# Altium PCB NB3000XN.PcbDoc (part 67 of 71)
Units mil, origin at the board's own origin, x right, y up, seen from the top; angles counter-clockwise.
Board outline 9527.56 x 6929.77 mil, 6 copper layers (Top Layer, GND+SHIELD, MidLayer1, MidLayer2, P2 - 3V3+5V0, Bottom Layer), stack 62.375 mil thick; 832 components, 1027 nets, 4655 pads, 4981 vias.
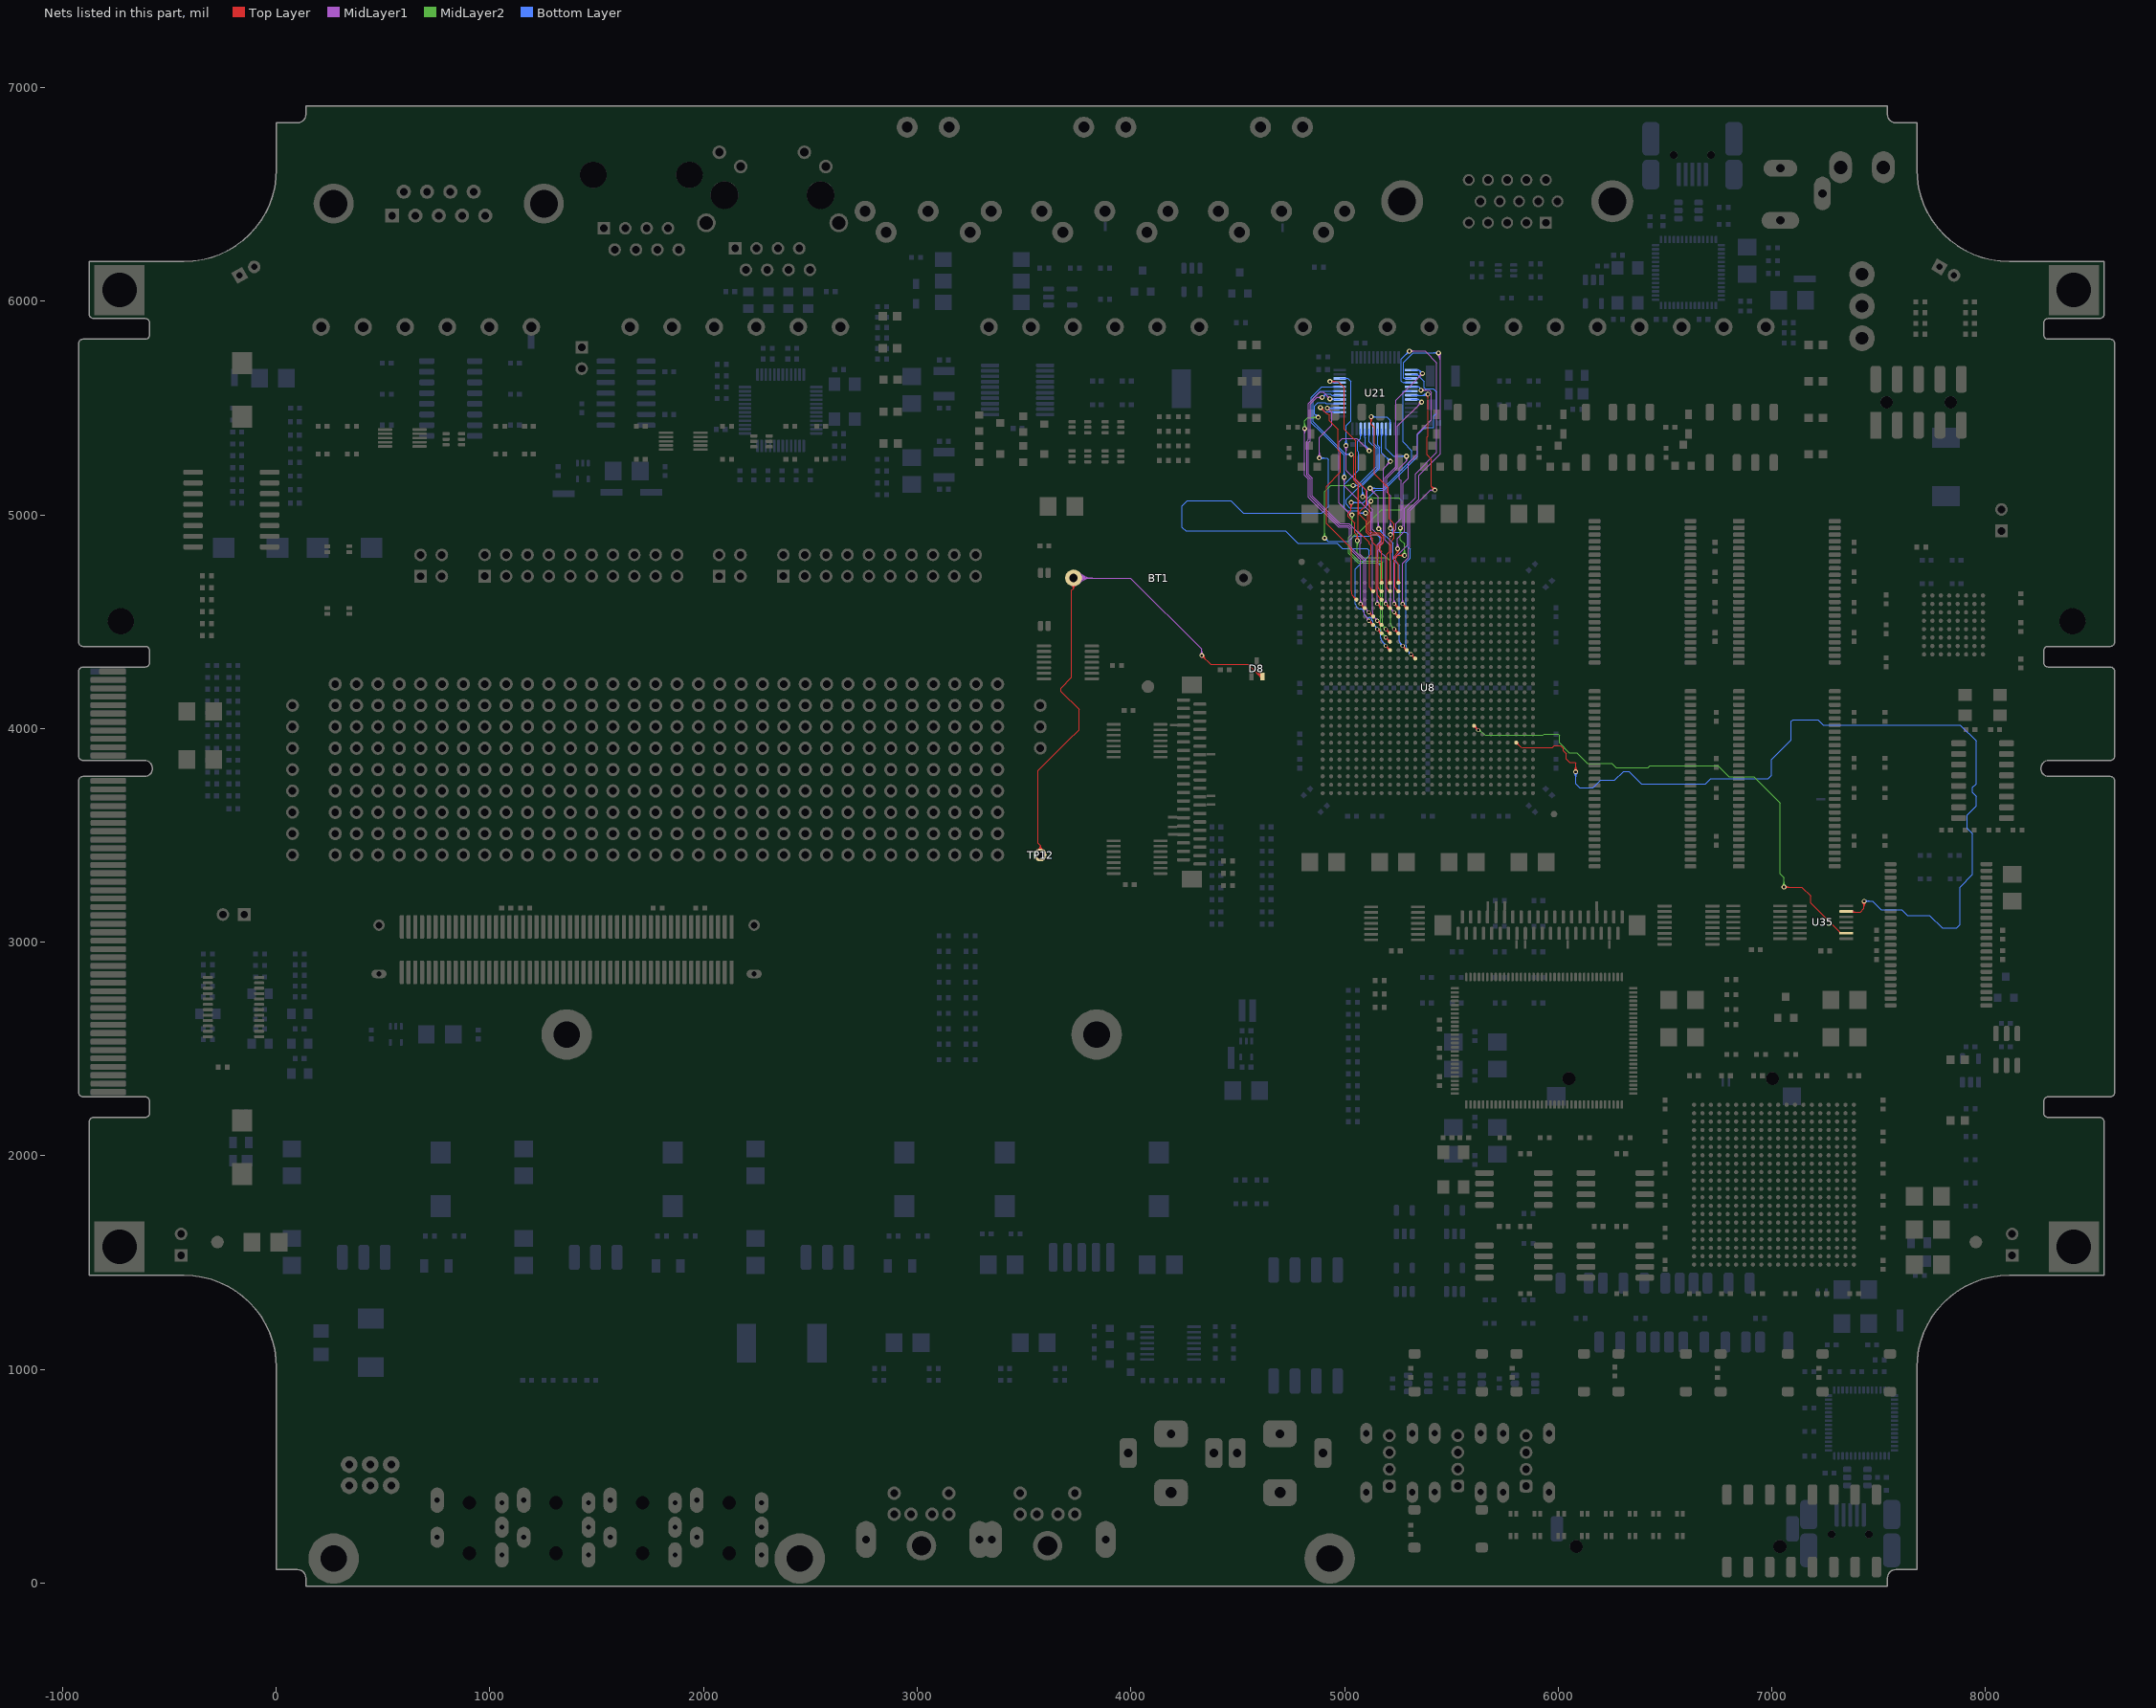
[diagram p71: the nets of this part, all layers, seen from the top]

## Via types
v1: diameter 23, hole 11.81, Top Layer to Bottom Layer, 3672 vias
v2: diameter 26, hole 11.81, Top Layer to Bottom Layer, 461 vias
v3: diameter 19, hole 11.81, Top Layer to Bottom Layer, tented both sides, 396 vias
v4: diameter 23.62, hole 11.81, Top Layer to Bottom Layer, 288 vias
v5: diameter 20, hole 11.81, Top Layer to Bottom Layer, 91 vias
v6: diameter 23, hole 11.81, Top Layer to Bottom Layer, tented both sides, 50 vias
v7: diameter 31, hole 11.81, Top Layer to Bottom Layer, 15 vias
v8: diameter 27.56, hole 11.81, Top Layer to Bottom Layer, tented both sides, 4 vias
v9: diameter 29, hole 11.81, Top Layer to Bottom Layer, 3 vias
v10: diameter 21, hole 11.81, Top Layer to Bottom Layer, 1 vias

## Nets (pads, with @x,y where several pads share a name; then routed paths per layer and width w, separated by ;. In a path a pad name is that pad's centre, name@x,y a point inside that pad or via, vN(x,y) a via of type N, cw(c..) or ccw(c..) an arc to the next point about the centre after c; other vN are vias at no path point) (continued)
USER_LEDS.LED7.GREEN: U8.Y24 U35.13 | length 4556.9
  Top Layer w4: v1@6075.14,3804.09 ccw(c6058.92,3820.31) 6081.86,3820.31 ccw(c6104.79,3820.31) v1@6088.57,3804.09 ; v1@6077.97,3801.26 ccw(c6068.58,3810.65) 6081.86,3810.65 ccw(c6095.14,3810.65) v1@6085.75,3801.26 ; v1(6081.86,3797.37) 6081.86,3838.14 6078.79,3841.21 6054.63,3841.21 6037.5,3858.34 6037.5,3882.73 6024.02,3896.2 6024.02,3907.29 6012.16,3919.15 5981.46,3919.15 5972.54,3910.23 5920,3910.23 5910,3910.23 5843.27,3910.23 ; U35.13@7348.5,3141.71 7415.19,3141.71 7431.86,3158.37 v1(7431.86,3191.71) ; U35.13@7374.98,3144.41 ccw(c7381.51,3150.93) 7381.51,3141.71 ; U35.13@7377.81,3147.24 ccw(c7391.16,3160.59) 7391.16,3141.71 ; v1@7425.14,3184.99 cw(c7408.92,3168.77) 7431.86,3168.77 cw(c7454.79,3168.77) v1@7438.57,3184.99 ; v1@7427.97,3187.82 cw(c7418.58,3178.43) 7431.86,3178.43 cw(c7445.14,3178.43) v1@7435.75,3187.82 ; 5815.92,3921.56 ccw(c5843.27,3948.91) 5843.27,3910.23 ; 5815.92,3921.56 ccw(c5843.27,3948.91) 5843.27,3910.23 ; 5815.92,3921.56 ccw(c5803.39,3909.03) 5803.39,3926.75 cw(c5803.39,3909.03) 5815.92,3921.56 ; 5815.92,3921.56 cw(c5828.45,3934.09) 5810.73,3934.09 ccw(c5828.45,3934.09) 5815.92,3921.56
  Bottom Layer w4: v1@6075.14,3790.66 cw(c6058.92,3774.44) 6081.86,3774.44 cw(c6104.79,3774.44) v1@6088.57,3790.66 ; v1@6077.97,3793.49 cw(c6068.58,3784.1) 6081.86,3784.1 cw(c6095.14,3784.1) v1@6085.75,3793.49 ; v1(6081.86,3797.37) 6081.86,3741.96 6099.78,3724.04 6164.19,3724.04 6198.52,3758.37 6265.19,3758.37 6306.86,3800.04 6331.86,3800.04 6390.19,3741.71 6690.19,3741.71 6715.19,3766.71 6983.19,3766.71 6998.52,3782.04 6998.52,3855.39 7090.19,3947.06 7090.19,4033.37 7098.52,4041.71 7215,4041.71 7240,4016.71 7306.86,4016.71 7345,4016.71 7881.86,4016.71 7956.86,3941.71 7956.86,3741.71 7940.19,3725.04 7940.19,3700.04 7956.86,3683.37 7956.86,3638.04 7915.19,3596.37 7915.19,3533.37 7940.19,3508.37 7940.19,3316.71 7881.86,3258.37 7881.86,3083.37 7865.19,3066.71 7797.02,3066.71 7738.73,3125 7633.69,3125 7607.23,3151.46 7510.79,3151.46 ; v1(7431.86,3191.71) 7470.54,3191.71 7510.79,3151.46 ; v1@7435.75,3187.82 cw(c7445.14,3178.43) 7445.14,3191.71 cw(c7445.14,3204.99) v1@7435.75,3195.6 ; v1@7438.57,3184.99 cw(c7454.79,3168.77) 7454.79,3191.71 cw(c7454.79,3214.64) v1@7438.57,3198.43 ; 7479.3,3182.95 7510.79,3151.46
USER_LEDS.LED7.RED: U8.V19 U35.9 | length 2687.9
  Top Layer w4: U8.V19@5606.54,4005.33 cw(c5606.54,3987.23) 5619.34,4000.03 cw(c5632.14,4012.83) U8.V19@5614.04,4012.83 ; U8.V19@5606.54,4005.49 cw(c5606.54,3987.77) 5619.07,4000.3 cw(c5631.6,4012.83) U8.V19@5613.88,4012.83 ; U8.V19@5606.54,4012.83 v3(5626.22,3993.15) ; v1(7056.86,3258.37) 7140.19,3258.37 7181.52,3217.04 7181.52,3183.71 7323.52,3041.71 7348.5,3041.71 U35.9@7348.5,3042.05 ; v1@7060.75,3254.49 cw(c7070.14,3245.1) 7070.14,3258.37 cw(c7070.14,3271.65) v1@7060.75,3262.26 ; v1@7063.57,3251.66 cw(c7079.79,3235.44) 7079.79,3258.37 cw(c7079.79,3281.31) v1@7063.57,3265.09 ; 7314.37,3050.86 cw(c7305.56,3042.05) U35.9@7318.02,3042.05 ; 7317.18,3048.06 ccw(c7322.02,3052.9) U35.9@7322.02,3046.05 ; 5613.42,4005.95 cw(c5600.61,3993.15) 5618.72,3993.15 ccw(c5600.61,3993.15) 5613.42,4005.95 ; 5613.42,4005.95 ccw(c5626.22,4018.76) 5626.22,4000.65 cw(c5626.22,4018.76) 5613.42,4005.95
  MidLayer2 w4: v3@5627.52,3985.76 cw(c5630.67,3967.93) 5641.05,3982.76 ; v3@5633.61,3994.45 ccw(c5651.44,3997.6) 5641.05,3982.76 ; v1@7050.14,3265.09 ccw(c7033.92,3281.31) 7056.86,3281.31 ccw(c7079.79,3281.31) v1@7063.57,3265.09 ; v1@7052.97,3262.26 ccw(c7043.58,3271.65) 7056.86,3271.65 ccw(c7070.14,3271.65) v1@7060.75,3262.26 ; 7055,3305 7039.86,3320.14 ; v1(7056.86,3258.37) 7056.86,3303.14 7039.86,3320.14 ; 5641.05,3982.76 5649.63,3975.68 ccw(c5665.85,3993.06) 5665.85,3969.29 5689.1,3969.29 5763.22,3969.29 5782.64,3969.29 5910,3969.29 5920,3969.29 5929.29,3969.29 5935,3975 6000,3975 6006,3969 6006,3933 6052,3887 6087.69,3887 6137.13,3837.56 6249.68,3837.56 6270.52,3816.71 6420.54,3816.71 6428.88,3825.04 6748.52,3825.04 6798.52,3775.04 6915.19,3775.04 7039.86,3650.37 7039.86,3320.14
VBATT: BT1.1 D8.2 TP12.1 | length 3668
  Top Layer w4: TP12.1@3564.05,3433.5 ccw(c3554.92,3452.64) 3576.12,3452.64 ; TP12.1@3565.78,3429.89 ccw(c3557.95,3446.29) 3576.12,3446.29 ccw(c3594.3,3446.29) TP12.1@3586.46,3429.89 ; TP12.1@3567.5,3426.28 ccw(c3560.97,3439.95) 3576.12,3439.95 ccw(c3591.27,3439.95) TP12.1@3584.74,3426.28 ; TP12.1@3576.12,3408.23 3576.12,3452.64 ; TP12.1@3588.19,3433.5 cw(c3597.33,3452.64) 3576.12,3452.64 ; BT1.1@3721.44,4669.07 cw(c3717.53,4655.42) 3731.73,4655.42 ; BT1.1@3722.54,4672.92 cw(c3719.05,4660.73) 3731.73,4660.73 cw(c3744.41,4660.73) BT1.1@3740.92,4672.92 ; BT1.1@3731.73,4705 3731.73,4655.42 ; BT1.1@3742.02,4669.07 ccw(c3745.93,4655.42) 3731.73,4655.42 ; v1@4331.86,4332.21 cw(c4331.86,4309.27) 4348.07,4325.49 cw(c4364.29,4341.71) v1@4341.36,4341.71 ; v1@4331.86,4336.21 cw(c4331.86,4322.93) 4341.25,4332.32 cw(c4350.64,4341.71) v1@4337.36,4341.71 ; v1(4331.86,4341.71) 4373.52,4300.04 4548.52,4300.04 4604,4244.57 D8.2@4615.59,4244.57 ; 4568.97,4279.59 ccw(c4615.59,4326.21) D8.2@4615.59,4260.28 ; 4575.8,4272.77 ccw(c4615.59,4312.56) D8.2@4615.59,4256.28 ; 4582.63,4265.94 ccw(c4615.59,4298.9) D8.2@4615.59,4252.28 ; 4589.46,4259.11 ccw(c4615.59,4285.24) D8.2@4615.59,4248.28 ; 4596.28,4252.28 ccw(c4615.59,4271.59) D8.2@4615.59,4244.28 ; 4603.11,4245.45 ccw(c4615.59,4257.93) D8.2@4615.59,4240.28 ; D8.2@4608.11,4241.73 ccw(c4604,4240.17) 4604,4244.57 ccw(c4604,4248.97) D8.2@4608.11,4247.4 ; 3576.12,3452.64 3565.19,3463.57 3565.19,3803.02 3705.04,3942.87 3757.19,3995.02 3757.19,4089.37 3673.52,4173.04 3673.52,4189.71 3723.52,4239.71 3723.52,4647.21 3731.73,4655.42
  MidLayer1 w4: BT1.1@3731.73,4705 3998.69,4705 4331.86,4371.83 v1(4331.86,4341.71) ; BT1.1@3744.01,4692.72 cw(c3773.67,4663.07) 3773.67,4705 cw(c3773.67,4746.94) BT1.1@3744.01,4717.28 ; BT1.1@3746.84,4689.89 cw(c3783.32,4653.41) 3783.32,4705 cw(c3783.32,4756.59) BT1.1@3746.84,4720.11 ; BT1.1@3749.67,4687.06 cw(c3792.98,4643.75) 3792.98,4705 cw(c3792.98,4766.25) BT1.1@3749.67,4722.94 ; BT1.1@3752.5,4684.23 cw(c3802.64,4634.09) 3802.64,4705 cw(c3802.64,4775.91) BT1.1@3752.5,4725.77 ; BT1.1@3755.33,4681.4 cw(c3812.29,4624.44) 3812.29,4705 cw(c3812.3,4785.56) BT1.1@3755.33,4728.6 ; BT1.1@3758.16,4678.58 cw(c3821.95,4614.78) 3821.95,4705 cw(c3821.95,4795.22) BT1.1@3758.16,4731.42 ; v1@4325.14,4348.43 ccw(c4308.92,4364.64) 4331.86,4364.64 ccw(c4354.79,4364.64) v1@4338.57,4348.43 ; v1@4327.97,4345.6 ccw(c4318.58,4354.99) 4331.86,4354.99 ccw(c4345.14,4354.99) v1@4335.75,4345.6
VGA.BLUE0: U8.K12 U21.8 | length 1731.7
  Top Layer w4: v3(5311.26,4347.48) U8.K12@5330.94,4327.8 ; U8.K12@5323.44,4327.8 ccw(c5305.34,4327.8) 5318.14,4340.6 ccw(c5330.94,4353.4) U8.K12@5330.94,4335.3 ; U8.K12@5323.6,4327.8 ccw(c5305.88,4327.8) 5318.41,4340.33 ccw(c5330.94,4352.86) U8.K12@5330.94,4335.14 ; 5324.06,4334.68 cw(c5336.87,4347.48) 5318.76,4347.48 ccw(c5336.87,4347.48) 5324.06,4334.68 ; 5324.06,4334.68 ccw(c5311.26,4321.87) 5311.26,4339.98 cw(c5311.26,4321.87) 5324.06,4334.68
  MidLayer1 w4: v1@5208.47,4944.09 ccw(c5192.26,4960.31) 5215.19,4960.31 ccw(c5238.13,4960.31) v1@5221.91,4944.09 ; v1@5211.3,4941.26 ccw(c5201.91,4950.65) 5215.19,4950.65 ccw(c5228.47,4950.65) v1@5219.08,4941.26 ; v1(5215.19,4937.37) 5215.19,5049.94 5215.19,5089.81 5198.19,5106.81 5198.19,5171.69 5248.52,5222.02 5248.52,5415.52 v1(5361,5528) ; v1@5351.5,5528 cw(c5328.56,5528) 5344.78,5511.78 cw(c5361,5495.56) v1@5361,5518.5 ; v1@5355.5,5528 cw(c5342.22,5528) 5351.61,5518.61 cw(c5361,5509.22) v1@5361,5522.5
  Bottom Layer w4: v1@5215.19,4927.87 cw(c5215.19,4904.94) 5231.41,4921.16 cw(c5247.63,4937.37) v1@5224.69,4937.37 ; v1@5215.19,4931.87 cw(c5215.19,4918.6) 5224.58,4927.99 cw(c5233.97,4937.37) v1@5220.69,4937.37 ; v1(5215.19,4937.37) 5232.56,4920 5287.52,4920 5297.52,4910 5297.52,4850.04 5306.86,4840.71 5306.86,4797.02 5287.4,4777.56 5287.4,4724.74 5287.4,4720 5287.4,4710 5287.4,4503.9 5287.4,4484.48 5287.4,4410.36 5287.4,4390.86 ccw(c5329.13,4390.86) 5299.62,4361.35 ; v3@5303.79,4348.13 ccw(c5285.75,4349.71) 5299.62,4361.35 ; v3@5311.91,4354.95 cw(c5313.49,4372.99) 5299.62,4361.35 ; U21.8@5312.32,5540.47 5346.09,5540.47 5358.56,5528 v1(5361,5528) ; U21.8@5338.68,5537.64 cw(c5345.51,5530.82) 5345.51,5540.47 cw(c5345.51,5550.13) U21.8@5338.68,5543.3
VGA.BLUE1: U8.D11 U21.7 | length 1561.1
  Top Layer w4: v3(5271.89,4583.7) U8.D11@5291.57,4564.02 ; U8.D11@5284.07,4564.02 ccw(c5265.97,4564.02) 5278.77,4576.82 ccw(c5291.57,4589.62) U8.D11@5291.57,4571.52 ; U8.D11@5284.23,4564.02 ccw(c5266.51,4564.02) 5279.04,4576.55 ccw(c5291.57,4589.08) U8.D11@5291.57,4571.36 ; v1(5390,5565) 5387.48,5565 5381.86,5559.37 5383.12,5558.12 5390.19,5551.04 5390.19,5370.04 5385.52,5365.37 5385.52,5281.37 5406.86,5260.04 5406.86,5133.37 v1(5423.52,5116.71) ; v1@5414.02,5116.71 ccw(c5391.09,5116.71) 5407.31,5132.93 ccw(c5423.52,5149.14) v1@5423.52,5126.21 ; v1@5418.02,5116.71 ccw(c5404.75,5116.71) 5414.14,5126.1 ccw(c5423.52,5135.49) v1@5423.52,5122.21 ; 5284.69,4570.9 cw(c5297.5,4583.7) 5279.39,4583.7 ccw(c5297.5,4583.7) 5284.69,4570.9 ; 5284.69,4570.9 ccw(c5271.89,4558.09) 5271.89,4576.2 cw(c5271.89,4558.09) 5284.69,4570.9
  MidLayer1 w4: v3@5266.59,4589 ccw(c5253.78,4601.81) 5271.89,4601.81 ccw(c5290,4601.81) v3@5277.19,4589 ; v3@5266.7,4588.89 ccw(c5254.16,4601.43) 5271.89,4601.43 ccw(c5289.62,4601.43) v3@5277.08,4588.89 ; v3(5271.89,4583.7) 5271.89,4661.38 5271.89,4710 5271.89,4720 5271.89,4773.37 5298.52,4800 5298.52,4843.02 5305.52,4850.02 5305.52,5020.37 5401.86,5116.71 ; v1@5416.54,5110.27 ccw(c5401.86,5096.75) 5401.86,5116.71 ; v1@5416.54,5123.14 cw(c5401.86,5136.66) 5401.86,5116.71 ; v1@5419.48,5112.98 ccw(c5410.98,5105.15) 5410.98,5116.71 ccw(c5410.98,5128.26) v1@5419.48,5120.43 ; v1(5423.52,5116.71) 5401.86,5116.71
  Bottom Layer w4: U21.7@5312.32,5560.16 5348.52,5560.16 5349.31,5559.37 5384.37,5559.37 v1(5390,5565) ; U21.7@5338.68,5557.33 cw(c5345.51,5550.5) 5345.51,5560.16 cw(c5345.51,5569.82) U21.7@5338.68,5562.99 ; 5353.48,5559.37 ccw(c5353.48,5601.52) v1@5383.28,5571.72 ; 5363.14,5559.37 ccw(c5363.14,5591.86) v1@5386.11,5568.89 ; 5372.8,5559.37 ccw(c5372.8,5582.2) v1@5388.94,5566.06
VGA.BLUE2: U8.J11 U21.6 | length 1834.4
  Top Layer w4: v3(5271.89,4386.85) U8.J11@5291.57,4367.17 ; U8.J11@5284.07,4367.17 ccw(c5265.97,4367.17) 5278.77,4379.97 ccw(c5291.57,4392.77) U8.J11@5291.57,4374.67 ; U8.J11@5284.23,4367.17 ccw(c5266.51,4367.17) 5279.04,4379.7 ccw(c5291.57,4392.23) U8.J11@5291.57,4374.51 ; 5284.69,4374.05 cw(c5297.5,4386.85) 5279.39,4386.85 ccw(c5297.5,4386.85) 5284.69,4374.05 ; 5284.69,4374.05 ccw(c5271.89,4361.24) 5271.89,4379.35 cw(c5271.89,4361.24) 5284.69,4374.05
  MidLayer1 w4: v1@5116.19,5125.04 v1@5116.23,5125 ; v1@5120,5115.5 cw(c5120,5101.66) 5129.78,5111.45 ; v1(5120,5125) v1@5116.23,5125 ; v1@5125.5,5125 ccw(c5147.88,5125) 5132.05,5109.18 ; v1@5129.5,5125 ccw(c5161.53,5125) 5138.88,5102.35 ; v1@5153.28,4941.72 ccw(c5144.65,4950.35) 5156.86,4950.35 ; 5156.86,4946.21 ccw(c5171.21,4946.21) v1@5161.06,4936.06 ; 5156.86,4955.87 ccw(c5180.87,4955.87) v1@5163.89,4938.89 ; 5156.86,4965.52 ccw(c5190.52,4965.52) v1@5166.72,4941.72 ; v1(5160,4935) 5158.9,4935 5156.86,4937.04 5156.86,5084.37 5118.12,5123.12 v1@5116.23,5125
  Bottom Layer w4: v1(5120,5125) 5116.23,5125 5116.19,5125.04 5181.88,5125.04 5315.19,5258.35 5315.19,5300.04 5273.52,5341.71 5273.52,5578.52 5274.84,5579.84 U21.6@5312.32,5579.84 ; v1@5123.89,5121.11 cw(c5133.38,5111.62) 5133.38,5125.04 ; v1@5123.89,5128.89 ccw(c5133.18,5138.18) 5133.18,5125.04 ; v1@5126.72,5118.28 cw(c5143.03,5101.97) 5143.03,5125.04 ; v1@5126.72,5131.72 ccw(c5142.84,5147.84) 5142.84,5125.04 ; v1@5160,4925.5 cw(c5160,4905.23) 5174.34,4919.56 ; v1(5160,4935) 5158.9,4935 5227.19,4866.71 5227.19,4792.81 5256.38,4763.62 5256.38,4757.96 5256.38,4720 5256.38,4710 5256.38,4503.9 5256.38,4410.36 ccw(c5270.43,4410.36) 5260.5,4400.43 ; v1@5165.5,4935 ccw(c5181.44,4935) 5170.17,4923.73 ; v1@5169.5,4935 ccw(c5195.1,4935) 5177,4916.9 ; v3@5264.42,4387.5 ccw(c5246.38,4389.08) 5260.25,4400.72 ccw(c5274.12,4412.36) v3@5272.54,4394.32 ; U21.6@5285.97,5577.01 ccw(c5279.14,5570.19) 5279.14,5579.84 ccw(c5279.14,5589.5) U21.6@5285.97,5582.67
VGA.BLUE3: U8.A10 U21.5 | length 1455.2
  Top Layer w4: U8.A10@5246.9,4687.43 ccw(c5234.1,4700.23) 5252.2,4700.23 ccw(c5270.31,4700.23) U8.A10@5257.51,4687.43 ; U8.A10@5252.2,4682.13 5252.2,4710 5252.2,4720 5252.2,4724.74 5252.21,4771.94 5240,4784.15 5240,4800 5250.37,4810.37 v1(5280.52,4810.37) ; v1@5273.81,4803.66 ccw(c5257.59,4787.44) 5257.59,4810.37 ccw(c5257.59,4833.31) v1@5273.81,4817.09 ; v1@5276.64,4806.49 ccw(c5267.25,4797.1) 5267.25,4810.37 ccw(c5267.25,4823.65) v1@5276.64,4814.26 ; 5252.2,4699.85 cw(c5234.48,4699.85) 5247.01,4687.32 ccw(c5234.48,4699.85) 5252.2,4699.85 ; 5252.2,4699.85 ccw(c5269.93,4699.85) 5257.4,4687.32 cw(c5269.93,4699.85) 5252.2,4699.85
  MidLayer1 w4: v1(5261.52,4938.37) 5273.52,4950.37 5273.52,5146.37 5298.52,5171.37 5298.52,5241.69 5309.11,5252.28 5342.19,5285.37 5342.19,5380.71 5407.5,5446.02 5407.5,5572.25 5396.37,5583.37 v1(5357.86,5583.37) ; v1@5361.75,5579.49 cw(c5371.14,5570.1) 5371.14,5583.37 cw(c5371.14,5596.65) v1@5361.75,5587.26 ; v1@5364.57,5576.66 cw(c5380.79,5560.44) 5380.79,5583.37 cw(c5380.79,5606.31) v1@5364.57,5590.09
  MidLayer2 w4: v1@5254.81,4931.66 cw(c5238.59,4915.44) 5261.52,4915.44 cw(c5284.46,4915.44) v1@5268.24,4931.66 ; v1@5257.64,4934.49 cw(c5248.25,4925.1) 5261.52,4925.1 cw(c5274.8,4925.1) v1@5265.41,4934.49 ; v1(5261.52,4938.37) 5261.52,4883.37 5280.52,4864.37 v1(5280.52,4810.37) ; v1@5273.81,4817.09 ccw(c5257.59,4833.31) 5280.52,4833.31 ccw(c5303.46,4833.31) v1@5287.24,4817.09 ; v1@5276.64,4814.26 ccw(c5267.25,4823.65) 5280.52,4823.65 ccw(c5293.8,4823.65) v1@5284.41,4814.26
  Bottom Layer w4: U21.5@5312.32,5599.53 5347.86,5599.53 5357.86,5589.53 v1(5357.86,5583.37) ; U21.5@5338.68,5596.7 cw(c5345.51,5589.87) 5345.51,5599.53 cw(c5345.51,5609.18) U21.5@5338.68,5602.36 ; 5349.45,5597.94 cw(c5340.38,5588.87) v1@5352.61,5585.03 ; 5352.14,5595.24 ccw(c5357.86,5600.96) v1@5357.86,5592.87
VGA.BLUE4: U8.B10 U21.4 | length 1775.1
  Top Layer w4: v1@5242.72,4833.85 cw(c5233.6,4822.04) 5248.52,4822.04 ; v1(5248.52,4841.37) 5248.52,4822.04 ; v1@5254.33,4833.85 ccw(c5263.45,4822.04) 5248.52,4822.04 ; 5236.7,4662.47 ccw(c5246.85,4662.47) 5239.67,4655.29 ; 5236.7,4662.47 ccw(c5246.85,4662.47) 5239.67,4655.29 ; 5236.7,4662.47 5236.7,4710 5236.7,4720 5236.7,4724.74 5236.7,4776.14 5232,4780.84 5232,4805.52 5248.52,4822.04 ; 5239.67,4655.29 ccw(c5252.2,4667.83) 5252.2,4650.1 cw(c5252.2,4667.83) 5239.67,4655.29 ; 5239.67,4655.29 cw(c5227.14,4642.76) 5244.86,4642.76 ccw(c5227.14,4642.76) 5239.67,4655.29
  MidLayer1 w4: v1@5241.81,4848.09 ccw(c5225.59,4864.31) 5248.52,4864.31 ccw(c5271.46,4864.31) v1@5255.24,4848.09 ; v1@5244.64,4845.26 ccw(c5235.25,4854.65) 5248.52,4854.65 ccw(c5261.8,4854.65) v1@5252.41,4845.26 ; v1(5248.52,4841.37) 5248.52,4890.37 5281.52,4923.37 5281.52,5030.32 5331.86,5080.65 5331.86,5191.71 5432.19,5292.04 5432.19,5711.69 ; v1(5303.52,5766.71) 5377.17,5766.71 5431.86,5712.02 ; v1@5307.41,5762.82 cw(c5316.8,5753.43) 5316.8,5766.71 cw(c5316.8,5779.99) v1@5307.41,5770.6 ; v1@5310.24,5759.99 cw(c5326.46,5743.77) 5326.46,5766.71 cw(c5326.46,5789.64) v1@5310.24,5773.43
  Bottom Layer w4: U21.4@5285.97,5616.38 ccw(c5279.14,5609.56) 5279.14,5619.21 ccw(c5279.14,5628.87) U21.4@5285.97,5622.04 ; v1@5294.02,5766.71 cw(c5271.09,5766.71) 5287.31,5750.49 cw(c5303.52,5734.27) v1@5303.52,5757.21 ; v1@5298.02,5766.71 cw(c5284.75,5766.71) 5294.14,5757.32 cw(c5303.52,5747.93) v1@5303.52,5761.21 ; v1(5303.52,5766.71) 5265.52,5728.71 5265.52,5627.21 5273.52,5619.21 U21.4@5312.32,5619.21
VGA.BLUE5: U8.D10 U21.3 | length 1972.9
  Top Layer w4: v3(5232.52,4583.7) U8.D10@5252.2,4564.02 ; U8.D10@5244.7,4564.02 ccw(c5226.6,4564.02) 5239.4,4576.82 ccw(c5252.2,4589.62) U8.D10@5252.2,4571.52 ; U8.D10@5244.86,4564.02 ccw(c5227.14,4564.02) 5239.67,4576.55 ccw(c5252.2,4589.08) U8.D10@5252.2,4571.36 ; 5245.32,4570.9 cw(c5258.13,4583.7) 5240.02,4583.7 ccw(c5258.13,4583.7) 5245.32,4570.9 ; 5245.32,4570.9 ccw(c5232.52,4558.09) 5232.52,4576.2 cw(c5232.52,4558.09) 5245.32,4570.9
  MidLayer1 w4: v3@5227.33,4588.89 ccw(c5214.79,4601.43) 5232.52,4601.43 ccw(c5250.25,4601.43) v3@5237.71,4588.89 ; v3(5232.52,4583.7) 5232.52,4661.38 5232.52,4710 5232.52,4720 5232.52,4724.74 5232.52,4795.37 5297.52,4860.37 5297.52,5023.69 5348.19,5074.35 5348.19,5185.41 5448.52,5285.75 5448.52,5750.04 v1(5440.19,5758.37) ; v1@5433.47,5751.66 cw(c5397.14,5715.32) 5448.52,5715.32 ; v1@5436.3,5754.49 cw(c5406.79,5724.98) 5448.52,5724.98 ; v1@5439.13,5757.31 cw(c5416.45,5734.63) 5448.52,5734.63 ; v1@5441.96,5760.14 cw(c5426.11,5744.29) 5448.52,5744.29 ; 5232.52,4601.81 cw(c5214.41,4601.81) 5227.22,4589 ccw(c5214.41,4601.81) 5232.52,4601.81 ; 5232.52,4601.81 ccw(c5250.63,4601.81) 5237.82,4589 cw(c5250.63,4601.81) 5232.52,4601.81
  Bottom Layer w4: U21.3@5285.97,5636.07 ccw(c5279.14,5629.24) 5279.14,5638.9 ccw(c5279.14,5648.55) U21.3@5285.97,5641.73 ; U21.3@5312.32,5638.9 5278.52,5638.9 5276.52,5640.9 5276.52,5713.71 5321.19,5758.37 v1(5440.19,5758.37) ; v1@5433.47,5751.66 ccw(c5417.26,5735.44) 5417.26,5758.37 ccw(c5417.26,5781.31) v1@5433.47,5765.09 ; v1@5436.3,5754.49 ccw(c5426.91,5745.1) 5426.91,5758.37 ccw(c5426.91,5771.65) v1@5436.3,5762.26
VGA.BLUE6: U8.G10 U21.2 | length 2168.7
  Top Layer w4: v1@5024.47,5051.66 cw(c5008.26,5035.44) 5031.19,5035.44 cw(c5054.13,5035.44) v1@5037.91,5051.66 ; v1@5027.3,5054.49 cw(c5017.91,5045.1) 5031.19,5045.1 cw(c5044.47,5045.1) v1@5035.08,5054.49 ; v1@5031.86,5058.37 v1(5031.19,5058.37) 5031.19,5020.94 5017.5,5007.25 5017.5,4992.75 5048.52,4961.73 5048.52,4916.41 5060,4904.94 v1(5060,4880) 5060,4878.18 5056.86,4875.04 v1@5055.95,4875.95 ; v1@5053.28,4886.72 ccw(c5037.06,4902.93) 5060,4902.93 ccw(c5082.93,4902.93) v1@5066.72,4886.72 ; v1@5056.11,4883.89 ccw(c5046.72,4893.28) 5060,4893.28 ccw(c5073.28,4893.28) v1@5063.89,4883.89 ; v3(5232.52,4465.59) U8.G10@5252.2,4445.91 ; U8.G10@5244.7,4445.91 ccw(c5226.6,4445.91) 5239.4,4458.71 ccw(c5252.2,4471.51) U8.G10@5252.2,4453.41 ; U8.G10@5244.86,4445.91 ccw(c5227.14,4445.91) 5239.67,4458.44 ccw(c5252.2,4470.97) U8.G10@5252.2,4453.25 ; 5245.32,4452.79 cw(c5258.13,4465.59) 5240.02,4465.59 ccw(c5258.13,4465.59) 5245.32,4452.79 ; 5245.32,4452.79 ccw(c5232.52,4439.98) 5232.52,4458.09 cw(c5232.52,4439.98) 5245.32,4452.79
  MidLayer2 w4: v1@5053.28,4873.28 cw(c5037.06,4857.06) 5060,4857.06 cw(c5082.93,4857.06) v1@5066.72,4873.28 ; v1@5056.11,4876.11 cw(c5046.72,4866.72) 5060,4866.72 cw(c5073.28,4866.72) v1@5063.89,4876.11 ; v1(5060,4880) 5060,4821.9 5081.86,4800.04 5198.52,4800.04 5217.02,4781.55 5217.02,4728.73 5217.01,4724.74 5217.01,4720 5217.01,4710 5217.01,4640.9 ; 5217.01,4503.03 5217.01,4489.1 ; 5217.01,4699.16 5217.01,4640.9 ; 5221.13,4479.17 cw(c5231.06,4489.1) 5217.01,4489.1 ; v3@5225.05,4466.24 ccw(c5207.01,4467.82) 5220.88,4479.46 ccw(c5234.75,4491.1) v3@5233.17,4473.06 ; 5217.01,4489.1 5217.01,4582.64 5217.01,4640.9
  Bottom Layer w4: v1(5031.19,5058.37) 5089.19,5058.37 5147.52,5116.71 5184.86,5116.71 5341.52,5273.37 5341.52,5375.04 5374.86,5408.37 5415.52,5408.37 5417.19,5410.04 5417.19,5462.04 5431.86,5476.71 5431.86,5575.04 5415.19,5591.71 5376.86,5591.71 5373.52,5595.04 5373.52,5625.04 5340.19,5658.37 U21.2@5315.19,5658.37 ; v1@5035.08,5054.49 cw(c5044.47,5045.1) 5044.47,5058.37 cw(c5044.47,5071.65) v1@5035.08,5062.26 ; v1@5037.91,5051.66 cw(c5054.13,5035.44) 5054.13,5058.37 cw(c5054.13,5081.31) v1@5037.91,5065.09 ; U21.2@5335.85,5654.58 cw(c5335.85,5634.95) 5349.73,5648.83 ; U21.2@5335.85,5658.58 cw(c5335.85,5648.61) 5342.9,5655.66
VGA.BLUE7: U8.E10 U21.1 | length 1560.7
  Top Layer w4: v3(5232.52,4544.33) U8.E10@5252.2,4524.65 ; U8.E10@5244.7,4524.65 ccw(c5226.6,4524.65) 5239.4,4537.45 ccw(c5252.2,4550.25) U8.E10@5252.2,4532.15 ; U8.E10@5244.86,4524.65 ccw(c5227.14,4524.65) 5239.67,4537.18 ccw(c5252.2,4549.71) U8.E10@5252.2,4531.99 ; 5245.32,4531.53 cw(c5258.13,4544.33) 5240.02,4544.33 ccw(c5258.13,4544.33) 5245.32,4531.53 ; 5245.32,4531.53 ccw(c5232.52,4518.72) 5232.52,4536.83 cw(c5232.52,4518.72) 5245.32,4531.53
  MidLayer1 w4: 5217.01,4581.77 5217.01,4567.84 ; 5221.13,4557.91 cw(c5231.06,4567.84) 5217.01,4567.84 ; v3@5225.05,4544.98 ccw(c5207.01,4546.56) 5220.88,4558.2 ccw(c5234.75,4569.84) v3@5233.17,4551.8 ; v1@5355.69,5662.04 cw(c5332.76,5662.04) 5348.97,5645.82 cw(c5365.19,5629.61) v1@5365.19,5652.54 ; v1@5359.69,5662.04 cw(c5346.41,5662.04) 5355.8,5652.65 cw(c5365.19,5643.26) v1@5365.19,5656.54 ; v1(5365.19,5662.04) 5240.19,5537.04 5240.19,5225 5190.19,5175 5190.19,4883.37 5217.01,4856.55 5217.01,4724.74 5217.01,4720 5217.01,4710 5217.01,4661.38 5217.01,4567.84
  Bottom Layer w4: U21.1@5312.32,5678.27 5348.96,5678.27 ; U21.1@5338.68,5675.44 cw(c5345.51,5668.61) 5345.51,5678.27 cw(c5345.51,5687.92) U21.1@5338.68,5681.1 ; v1@5355.69,5662.04 ccw(c5332.76,5662.04) 5348.97,5678.26 ; v1@5359.69,5662.04 ccw(c5346.41,5662.04) 5355.8,5671.43 ccw(c5365.19,5680.82) v1@5365.19,5667.54 ; v1(5365.19,5662.04) 5348.96,5678.27 ; v1@5365.19,5671.54 cw(c5365.19,5694.48) 5348.97,5678.26
VGA.GREEN0: U8.D8 U21.34 | length 1511.7
  Top Layer w4: v3(5153.78,4583.7) U8.D8@5173.46,4564.02 ; U8.D8@5165.96,4564.02 ccw(c5147.86,4564.02) 5160.66,4576.82 ccw(c5173.46,4589.62) U8.D8@5173.46,4571.52 ; U8.D8@5166.12,4564.02 ccw(c5148.4,4564.02) 5160.93,4576.55 ccw(c5173.46,4589.08) U8.D8@5173.46,4571.36 ; 5166.58,4570.9 cw(c5179.39,4583.7) 5161.28,4583.7 ccw(c5179.39,4583.7) 5166.58,4570.9 ; 5166.58,4570.9 ccw(c5153.78,4558.09) 5153.78,4576.2 cw(c5153.78,4558.09) 5166.58,4570.9
  MidLayer1 w4: v1@5000.14,5318.32 cw(c4983.92,5302.11) 5006.86,5302.11 cw(c5029.79,5302.11) v1@5013.57,5318.32 ; v1@5002.97,5321.15 cw(c4993.58,5311.76) 5006.86,5311.76 cw(c5020.14,5311.76) v1@5010.75,5321.15 ; v1(5006.86,5325.04) 5006.86,5208.37 5105.52,5109.71 5105.52,5051.37 5131.86,5025.04 5131.86,4933.37 5173.52,4891.71 5173.52,4879.79 5153.78,4860.04 5153.78,4724.74 5153.78,4720 5153.78,4710 5153.78,4661.38 v3(5153.78,4583.7) ; v3@5148.48,4589 ccw(c5135.67,4601.81) 5153.78,4601.81 ccw(c5171.89,4601.81) v3@5159.08,4589 ; v3@5148.59,4588.89 ccw(c5136.05,4601.43) 5153.78,4601.43 ccw(c5171.51,4601.43) v3@5158.97,4588.89
  Bottom Layer w4: U21.34@4977.68,5638.9 5015.52,5638.9 5029.52,5624.9 5029.52,5441.37 5006.86,5418.71 v1(5006.86,5325.04) ; v1@5000.14,5331.76 ccw(c4983.92,5347.98) 5006.86,5347.98 ccw(c5029.79,5347.98) v1@5013.57,5331.76 ; v1@5002.97,5328.93 ccw(c4993.58,5338.32) 5006.86,5338.32 ccw(c5020.14,5338.32) v1@5010.75,5328.93 ; U21.34@5004.03,5636.07 cw(c5010.86,5629.24) 5010.86,5638.9 cw(c5010.86,5648.55) U21.34@5004.03,5641.73
VGA.GREEN1: U8.C8 U21.33 | length 1441
  Top Layer w4: v1(4931.86,5625.04) 4970.86,5625.04 4998.52,5597.37 4998.52,5400.04 5052.19,5346.37 5052.19,5166.71 ; v1@4935.75,5621.15 cw(c4945.14,5611.76) 4945.14,5625.04 cw(c4945.14,5638.32) v1@4935.75,5628.93 ; v1@4938.57,5618.32 cw(c4954.79,5602.11) 4954.79,5625.04 cw(c4954.79,5647.98) v1@4938.57,5631.76 ; U8.C8@5166.12,4603.39 ccw(c5148.4,4603.39) 5160.93,4615.92 ; U8.C8@5173.46,4610.73 cw(c5173.46,4628.45) 5160.93,4615.92 ; 5052.19,5166.71 5098.52,5120.37 ; 5052.19,5166.71 5098.52,5120.37 ; 5098.52,5120.37 5102.5,5116.4 5102.5,5045.68 5073.52,5016.71 5073.52,4998.71 5101.19,4971.04 5101.19,4919.71 5131.86,4889.04 5131.86,4870.96 5149.6,4853.22 5149.6,4720 5149.6,4710 5149.6,4643.27 ccw(c5188.28,4643.27) 5160.93,4615.92
  Bottom Layer w4: v1(4931.86,5625.04) 4937.69,5619.21 U21.33@4977.68,5619.21 ; v1@4932.92,5626.1 ccw(c4949.55,5642.73) U21.33@4949.55,5619.21 ; v1@4935.75,5628.93 ccw(c4959.21,5652.39) U21.33@4959.21,5619.21 ; v1@4938.57,5631.76 ccw(c4968.86,5662.05) U21.33@4968.86,5619.21 ; U21.33@4951.32,5616.38 ccw(c4944.49,5609.56) 4944.49,5619.21 ccw(c4944.49,5628.87) U21.33@4951.32,5622.04
VGA.GREEN2: U8.F8 U21.32 | length 1618
  Top Layer w4: v3(5153.78,4504.96) U8.F8@5173.46,4485.28 ; U8.F8@5165.96,4485.28 ccw(c5147.86,4485.28) 5160.66,4498.08 ccw(c5173.46,4510.88) U8.F8@5173.46,4492.78 ; U8.F8@5166.12,4485.28 ccw(c5148.4,4485.28) 5160.93,4497.81 ccw(c5173.46,4510.34) U8.F8@5173.46,4492.62 ; 5166.58,4492.16 cw(c5179.39,4504.96) 5161.28,4504.96 ccw(c5179.39,4504.96) 5166.58,4492.16 ; 5166.58,4492.16 ccw(c5153.78,4479.35) 5153.78,4497.46 cw(c5153.78,4479.35) 5166.58,4492.16
  MidLayer1 w4: v1@4991.81,5169.99 cw(c4975.59,5153.77) 4998.52,5153.77 cw(c5021.46,5153.77) v1@5005.24,5169.99 ; v1@4994.64,5172.82 cw(c4985.25,5163.43) 4998.52,5163.43 cw(c5011.8,5163.43) v1@5002.41,5172.82 ; v1(4998.52,5176.71) 4998.52,5136.04 5123.52,5011.04 5123.52,4885.77 5129.92,4879.37 5129.92,4720 5129.92,4710 5129.92,4661.38 5129.92,4641.96 5129.92,4567.84 ; 5129.92,4581.77 5129.92,4567.84 ; v3@5146.31,4505.61 ccw(c5128.27,4507.19) 5142.14,4518.83 ; v3@5154.43,4512.43 cw(c5156.01,4530.47) 5142.14,4518.83 ; 5129.92,4567.84 5129.92,4548.34 ccw(c5171.65,4548.34) 5142.14,4518.83
  Bottom Layer w4: U21.32@4951.32,5596.7 ccw(c4944.49,5589.87) 4944.49,5599.53 ccw(c4944.49,5609.18) U21.32@4951.32,5602.36 ; U21.32@4977.68,5599.53 4894.53,5599.53 4845,5550 4845,5432.23 4886.15,5391.09 4998.52,5278.71 v1(4998.52,5176.71) ; v1@4991.81,5183.43 ccw(c4975.59,5199.64) 4998.52,5199.64 ccw(c5021.46,5199.64) v1@5005.24,5183.43 ; v1@4994.64,5180.6 ccw(c4985.25,5189.99) 4998.52,5189.99 ccw(c5011.8,5189.99) v1@5002.41,5180.6
VGA.GREEN3: U8.B7 U21.31 | length 1562.5
  Top Layer w4: v1(5031.86,5283.37) 5042.81,5272.42 5042.81,5162.42 5057.86,5147.37 ; 5055.83,5149.4 5064.7,5140.54 ; 5065.19,5001.69 5065.19,5140.04 5064.7,5140.54 ; 5064.7,4960 5064.7,4922.87 5115.19,4872.37 5115.19,4865 5123.52,4856.67 5123.52,4830 5123.52,4816.64 5118.59,4811.7 5118.59,4737.37 5118.59,4733 5118.59,4724.74 5118.59,4720 5118.59,4710 5118.59,4662.47 ; 5064.7,4960 5064.7,5001.19 5064.7,4960 ; 5064.7,4960 5064.7,5140.54 ; 5118.59,4662.47 ccw(c5128.74,4662.47) 5121.56,4655.29 ; 5118.59,4662.47 ccw(c5128.74,4662.47) 5121.56,4655.29 ; 5121.56,4655.29 ccw(c5134.09,4667.83) 5134.09,4650.1 cw(c5134.09,4667.83) 5121.56,4655.29 ; 5121.56,4655.29 cw(c5109.03,4642.76) 5126.75,4642.76 ccw(c5109.03,4642.76) 5121.56,4655.29
  Bottom Layer w4: 4856.86,5550.04 4886.66,5579.84 ; U21.31@4951.32,5577.01 ccw(c4944.49,5570.19) 4944.49,5579.84 ccw(c4944.49,5589.5) U21.31@4951.32,5582.67 ; U21.31@4977.68,5579.84 4886.66,5579.84 ; v1@5025.14,5276.66 ccw(c5008.92,5260.44) 5008.92,5283.37 ccw(c5008.92,5306.31) v1@5025.14,5290.09 ; v1@5027.97,5279.49 ccw(c5018.58,5270.1) 5018.58,5283.37 ccw(c5018.58,5296.65) v1@5027.97,5287.26 ; v1(5031.86,5283.37) 5005.17,5283.37 4853,5435.55 4853,5546.69 4886.16,5579.84 4886.66,5579.84
VGA.GREEN4: U8.E7 U21.30 | length 1563
  Top Layer w4: v3(5114.41,4544.33) U8.E7@5134.09,4524.65 ; U8.E7@5126.59,4524.65 ccw(c5108.49,4524.65) 5121.29,4537.45 ccw(c5134.09,4550.25) U8.E7@5134.09,4532.15 ; U8.E7@5126.75,4524.65 ccw(c5109.03,4524.65) 5121.56,4537.18 ccw(c5134.09,4549.71) U8.E7@5134.09,4531.99 ; 5127.21,4531.53 ccw(c5114.41,4518.72) 5114.41,4536.83 cw(c5114.41,4518.72) 5127.21,4531.53 ; 5127.21,4531.53 cw(c5140.02,4544.33) 5121.91,4544.33 ccw(c5140.02,4544.33) 5127.21,4531.53
  MidLayer1 w4: v1@4888.81,5543.32 ccw(c4872.59,5527.11) 4872.59,5550.04 ccw(c4872.59,5572.98) v1@4888.81,5556.76 ; v1@4891.64,5546.15 ccw(c4882.25,5536.76) 4882.25,5550.04 ccw(c4882.25,5563.32) v1@4891.64,5553.93 ; v1(4895.52,5550.04) 4871.84,5550.04 4840.19,5518.39 4840.19,5494.71 4840.19,5347.37 4831.86,5339.04 4831.86,5189.34 4848.52,5172.67 4848.52,5089.32 4978.8,4959.04 5021.82,4959.04 5077.86,4903 5077.86,4869.37 5073.52,4865.04 5073.52,4815.37 5098.9,4790 5098.9,4724.74 5098.9,4720 5098.9,4710 5098.9,4661.38 5098.9,4567.84 ccw(c5112.95,4567.84) 5103.02,4557.91 ; v3@5106.94,4544.98 ccw(c5088.9,4546.56) 5102.77,4558.2 ccw(c5116.64,4569.84) v3@5115.06,4551.8
  Bottom Layer w4: v1(4895.52,5550.04) 4912.19,5566.71 4934.97,5566.71 4941.52,5560.16 U21.30@4977.68,5560.16 ; v1@4895.52,5555.54 ccw(c4895.52,5568.82) 4904.91,5559.43 ccw(c4914.3,5550.04) v1@4901.02,5550.04 ; v1@4895.52,5559.54 ccw(c4895.52,5582.48) 4911.74,5566.26 ccw(c4927.96,5550.04) v1@4905.02,5550.04 ; U21.30@4951.32,5557.33 ccw(c4944.49,5550.5) 4944.49,5560.16 ccw(c4944.49,5569.82) U21.30@4951.32,5562.99
VGA.GREEN5: U8.F7 U21.29 | length 1637.1
  Top Layer w4: v3(5114.41,4504.96) U8.F7@5134.09,4485.28 ; U8.F7@5126.59,4485.28 ccw(c5108.49,4485.28) 5121.29,4498.08 ccw(c5134.09,4510.88) U8.F7@5134.09,4492.78 ; U8.F7@5126.75,4485.28 ccw(c5109.03,4485.28) 5121.56,4497.81 ccw(c5134.09,4510.34) U8.F7@5134.09,4492.62 ; 5127.21,4492.16 ccw(c5114.41,4479.35) 5114.41,4497.46 cw(c5114.41,4479.35) 5127.21,4492.16 ; 5127.21,4492.16 cw(c5140.02,4504.96) 5121.91,4504.96 ccw(c5140.02,4504.96) 5127.21,4492.16
  MidLayer1 w4: 4840,5115 4840,5086.53 4975.48,4951.04 5018.5,4951.04 5031.86,4937.69 5031.86,4845.73 5090.55,4787.04 5090.55,4724.74 5090.55,4720 5090.55,4710 5090.55,4661.38 5090.55,4641.96 5090.55,4567.84 ; 4840,5150 4840,5169.88 4823.52,5186.35 4823.52,5344.04 4831.86,5352.37 4831.86,5521.37 4885.52,5575.04 4899.86,5575.04 v1(4931.52,5543.37) ; 4840.19,5115 4840.19,5150 ; v1@4922.02,5543.37 ccw(c4899.09,5543.37) 4915.31,5559.59 ccw(c4931.52,5575.81) v1@4931.52,5552.87 ; v1@4926.02,5543.37 ccw(c4912.75,5543.37) 4922.13,5552.76 ccw(c4931.52,5562.15) v1@4931.52,5548.87 ; 5090.55,4581.77 5090.55,4567.84 ; v3@5107.02,4506.26 ccw(c5089.19,4509.41) 5104.02,4519.79 ; v3@5115.71,4512.35 cw(c5118.86,4530.18) 5104.02,4519.79 ; 5090.55,4567.84 5090.55,4544.59 ccw(c5114.32,4544.59) 5096.94,4528.37 5104.02,4519.79
  Bottom Layer w4: v1(4931.52,5543.37) 4934.43,5540.47 U21.29@4977.68,5540.47 ; v1@4935.41,5547.26 ccw(c4951.81,5563.66) U21.29@4951.81,5540.47 ; v1@4938.24,5536.66 cw(c4947.45,5527.45) 4947.45,5540.47 ; v1@4938.24,5550.09 ccw(c4961.47,5573.32) U21.29@4961.47,5540.47 ; U21.29@4951.32,5537.64 ccw(c4944.49,5530.82) 4944.49,5540.47 ccw(c4944.49,5550.13) U21.29@4951.32,5543.3
VGA.GREEN6: U8.D6 U21.28 | length 1698.3
  Top Layer w4: v3(5075.04,4583.7) U8.D6@5094.72,4564.02 ; U8.D6@5087.22,4564.02 ccw(c5069.12,4564.02) 5081.92,4576.82 ccw(c5094.72,4589.62) U8.D6@5094.72,4571.52 ; U8.D6@5087.38,4564.02 ccw(c5069.66,4564.02) 5082.19,4576.55 ccw(c5094.72,4589.08) U8.D6@5094.72,4571.36 ; 5087.84,4570.9 cw(c5100.65,4583.7) 5082.54,4583.7 ccw(c5100.65,4583.7) 5087.84,4570.9 ; 5087.84,4570.9 ccw(c5075.04,4558.09) 5075.04,4576.2 cw(c5075.04,4558.09) 5087.84,4570.9
  MidLayer1 w4: v1@4806.81,5397.66 cw(c4790.59,5381.44) 4813.52,5381.44 cw(c4836.46,5381.44) v1@4820.24,5397.66 ; v1@4809.64,5400.49 cw(c4800.25,5391.1) 4813.52,5391.1 cw(c4826.8,5391.1) v1@4817.41,5400.49 ; v1(4813.52,5404.37) 4813.52,5185.04 4831.86,5166.71 4831.86,5083.35 4972.17,4943.04 5015.19,4943.04 5023.52,4934.71 5023.52,4842.75 5075.04,4791.23 5075.04,4720 5075.04,4710 5075.04,4661.38 v3(5075.04,4583.7) ; v3@5069.85,4588.89 ccw(c5057.31,4601.43) 5075.04,4601.43 ccw(c5092.77,4601.43) v3@5080.23,4588.89 ; 5075.04,4601.81 cw(c5056.93,4601.81) 5069.74,4589 ccw(c5056.93,4601.81) 5075.04,4601.81 ; 5075.04,4601.81 ccw(c5093.15,4601.81) 5080.34,4589 cw(c5093.15,4601.81) 5075.04,4601.81
  MidLayer2 w4: v1@4806.81,5411.09 ccw(c4790.59,5427.31) 4813.52,5427.31 ccw(c4836.46,5427.31) v1@4820.24,5411.09 ; v1@4809.64,5408.26 ccw(c4800.25,5417.65) 4813.52,5417.65 ccw(c4826.8,5417.65) v1@4817.41,5408.26 ; v1(4813.52,5404.37) 4813.52,5441.67 4828.86,5457 v1(4877,5457) ; v1@4870.28,5450.28 ccw(c4854.06,5434.06) 4854.06,5457 ccw(c4854.06,5479.93) v1@4870.28,5463.72 ; v1@4873.11,5453.11 ccw(c4863.72,5443.72) 4863.72,5457 ccw(c4863.72,5470.28) v1@4873.11,5460.89
  Bottom Layer w4: v1@4867.5,5457.09 ccw(c4845.31,5457.31) 4861,5473 ccw(c4876.69,5488.69) v1@4876.91,5466.5 ; v1@4871.5,5457.05 ccw(c4858.65,5457.18) 4867.74,5466.26 ccw(c4876.82,5475.35) v1@4876.95,5462.5 ; v1(4877,5457) 4861,5473 4861,5511 4875,5525 4910,5525 4914.21,5520.79 U21.28@4977.68,5520.79
VGA.GREEN7: U8.G8 U21.27 | length 3183.3
  Top Layer w4: v3(5153.78,4465.59) U8.G8@5173.46,4445.91 ; U8.G8@5165.96,4445.91 ccw(c5147.86,4445.91) 5160.66,4458.71 ccw(c5173.46,4471.51) U8.G8@5173.46,4453.41 ; U8.G8@5166.12,4445.91 ccw(c5148.4,4445.91) 5160.93,4458.44 ccw(c5173.46,4470.97) U8.G8@5173.46,4453.25 ; 5166.58,4452.79 cw(c5179.39,4465.59) 5161.28,4465.59 ccw(c5179.39,4465.59) 5166.58,4452.79 ; 5166.58,4452.79 ccw(c5153.78,4439.98) 5153.78,4458.09 cw(c5153.78,4439.98) 5166.58,4452.79
  MidLayer1 w4: v1@4875.14,5273.43 ccw(c4858.92,5289.64) 4881.86,5289.64 ccw(c4904.79,5289.64) v1@4888.57,5273.43 ; v1@4877.97,5270.6 ccw(c4868.58,5279.99) 4881.86,5279.99 ccw(c4895.14,5279.99) v1@4885.75,5270.6 ; v1(4881.86,5266.71) 4881.86,5361.86 4940,5420 4940,5479.56 v1(4919.52,5500.04) ; v1@4919.52,5490.54 cw(c4919.52,5467.61) 4935.74,5483.82 cw(c4951.96,5500.04) v1@4929.02,5500.04 ; v1@4919.52,5494.54 cw(c4919.52,5481.26) 4928.91,5490.65 cw(c4938.3,5500.04) v1@4925.02,5500.04
  Bottom Layer w4: v1(4881.86,5266.71) 4918.29,5266.71 4925,5260 4925,5040 4893.04,5008.04 4526.84,5008.04 4468.17,5066.71 4265.19,5066.71 4240.19,5041.71 4240.19,4941.71 4256.86,4925.04 4723.52,4925.04 4759.55,4889.01 4781.06,4867.5 4964.4,4867.5 4990.19,4841.71 5106.86,4841.71 5115.19,4833.37 5115.19,4810 5051.27,4746.08 5051.27,4728.73 5051.27,4724.74 5051.27,4720 5051.27,4710 5051.27,4700.22 5051.27,4641.96 5051.27,4583.7 ccw(c5075.04,4583.7) 5075.04,4559.93 cw(c5075.04,4544.33) 5090.64,4544.33 ccw(c5114.41,4544.33) 5114.41,4520.56 cw(c5114.41,4504.96) 5130.01,4504.96 ccw(c5153.78,4504.96) 5136.97,4488.15 5143.39,4480.42 ; v1@4885.75,5262.82 cw(c4895.14,5253.43) 4895.14,5266.71 cw(c4895.14,5279.99) v1@4885.75,5270.6 ; v1@4888.57,5259.99 cw(c4904.79,5243.77) 4904.79,5266.71 cw(c4904.79,5289.64) v1@4888.57,5273.43 ; v1(4919.52,5500.04) U21.27@4977.68,5500.04 ; v1@4923.41,5496.15 cw(c4932.8,5486.76) 4932.8,5500.04 cw(c4932.8,5513.32) v1@4923.41,5503.93 ; v1@4926.24,5493.32 cw(c4942.46,5477.11) 4942.46,5500.04 cw(c4942.46,5522.98) v1@4926.24,5506.76 ; 4941.93,5500.04 ccw(c4941.93,5513.32) U21.27@4951.32,5503.93 ; 4947.06,5500.04 cw(c4947.06,5494.01) U21.27@4951.32,5498.27 ; v3@5146.39,4466.89 ccw(c5128.56,4470.04) 5143.39,4480.42 ; v3@5155.08,4472.98 cw(c5158.23,4490.81) 5143.39,4480.42
VGA.RED0: U8.A9 U21.15 | length 1174.7
  Top Layer w4: v4@5118.06,5453.06 cw(c5101.31,5436.31) 5125,5436.31 cw(c5148.69,5436.31) v4@5131.94,5453.06 ; v4@5120.89,5455.89 cw(c5110.97,5445.97) 5125,5445.97 cw(c5139.03,5445.97) v4@5129.11,5455.89 ; v4(5125,5460) 5125,5425.19 5140.19,5410 5140.19,5191.71 5198.52,5133.37 5205,5126.9 5205,5098.04 5209.7,5093.34 5209.7,5030 ; U8.A9@5207.53,4687.43 ccw(c5194.73,4700.23) 5212.83,4700.23 ccw(c5230.94,4700.23) U8.A9@5218.14,4687.43 ; U8.A9@5207.64,4687.32 ccw(c5195.11,4699.85) 5212.83,4699.85 ccw(c5230.56,4699.85) U8.A9@5218.03,4687.32 ; 5209.7,5050.79 5209.7,5030 ; U8.A9@5212.83,4682.13 5212.83,4710 5212.83,4720 5212.83,4819.7 5220.19,4827.06 5220.19,4879.04 5232.86,4891.71 5232.86,4957.37 5215.19,4975.04 5209.7,4980.53 5209.7,5030 ; 5212.84,4724.74 5212.84,4725.04
  Bottom Layer w4: v4(5125,5460) 5123.37,5458.37 5198.52,5458.37 5213.9,5443 U21.15@5213.9,5402.68 ; v4@5129.11,5464.11 ccw(c5142.95,5477.95) 5142.95,5458.37 ; v4@5131.94,5453.06 cw(c5144.76,5440.24) 5144.76,5458.37 ; v4@5131.94,5466.94 ccw(c5152.61,5487.61) 5152.61,5458.37 ; U21.15@5211.07,5429.03 ccw(c5204.24,5435.86) 5213.9,5435.86 ccw(c5223.55,5435.86) U21.15@5216.73,5429.03
VGA.RED1: U8.B9 U21.16 | length 1097.5
  Top Layer w4: 5198.52,4816.71 5202.62,4820.81 ; U8.B9@5205.49,4642.76 ccw(c5187.77,4642.76) 5200.3,4655.29 ; U8.B9@5212.83,4650.1 cw(c5212.83,4667.83) 5200.3,4655.29 ; v1(5215.19,4908.37) 5215.19,4894.71 5212.19,4891.71 5212.19,4830.37 ; 5200.3,4655.29 cw(c5207.48,4662.47) 5197.33,4662.47 5197.33,4710 5197.33,4720 5197.33,4724.74 5197.33,4815.51 5202.62,4820.81 ; 5202.62,4820.81 5212.19,4830.37 ; 5202.62,4820.81 5212.19,4830.37
  MidLayer1 w4: v1(5215.19,4908.37) 5240.19,4933.37 5240.19,4958.37 5264.7,4982.88 5264.7,5159.81 5256.86,5167.64 5256.86,5218.37 5290.19,5251.71 v1(5290.19,5275.04) ; v1@5215.19,4913.87 ccw(c5215.19,4927.15) 5224.58,4917.76 ccw(c5233.97,4908.37) v1@5220.69,4908.37 ; v1@5215.19,4917.87 ccw(c5215.19,4940.81) 5231.41,4924.59 ccw(c5247.63,4908.37) v1@5224.69,4908.37 ; v1@5283.47,5268.32 cw(c5267.26,5252.11) 5290.19,5252.11 cw(c5313.13,5252.11) v1@5296.91,5268.32 ; v1@5286.3,5271.15 cw(c5276.91,5261.76) 5290.19,5261.76 cw(c5303.47,5261.76) v1@5294.08,5271.15
  Bottom Layer w4: U21.16@5191.77,5375.98 cw(c5187.95,5371.02) 5194.21,5371.02 ; U21.16@5194.21,5402.68 5194.21,5371.02 ; U21.16@5196.65,5375.98 ccw(c5200.47,5371.02) 5194.21,5371.02 ; v1@5283.47,5268.32 ccw(c5267.26,5252.11) 5267.26,5275.04 ccw(c5267.26,5297.98) v1@5283.47,5281.76 ; v1@5286.3,5271.15 ccw(c5276.91,5261.76) 5276.91,5275.04 ccw(c5276.91,5288.32) v1@5286.3,5278.93 ; v1(5290.19,5275.04) 5229.96,5275.04 5194.21,5310.79 5194.21,5371.02
VGA.RED2: U8.D9 U21.17 | length 1194.3
  Top Layer w4: v3(5193.15,4583.7) U8.D9@5212.83,4564.02 ; U8.D9@5205.33,4564.02 ccw(c5187.23,4564.02) 5200.03,4576.82 ccw(c5212.83,4589.62) U8.D9@5212.83,4571.52 ; U8.D9@5205.49,4564.02 ccw(c5187.77,4564.02) 5200.3,4576.55 ccw(c5212.83,4589.08) U8.D9@5212.83,4571.36 ; 5205.95,4570.9 ccw(c5193.15,4558.09) 5193.15,4576.2 cw(c5193.15,4558.09) 5205.95,4570.9 ; 5205.95,4570.9 cw(c5218.76,4583.7) 5200.65,4583.7 ccw(c5218.76,4583.7) 5205.95,4570.9
  MidLayer1 w4: v3@5187.85,4589 ccw(c5175.04,4601.81) 5193.15,4601.81 ccw(c5211.26,4601.81) v3@5198.45,4589 ; v3@5187.96,4588.89 ccw(c5175.42,4601.43) 5193.15,4601.43 ccw(c5210.88,4601.43) v3@5198.34,4588.89 ; v3(5193.15,4583.7) 5193.15,4661.38 5193.15,4710 5193.15,4720 5193.15,4724.74 5193.15,4802.04 5165.19,4830 5165.19,4858.37 5181.86,4875.04 5181.86,5217.71 v1(5215.19,5251.04) ; v1@5205.69,5251.04 cw(c5182.76,5251.04) 5198.97,5234.82 cw(c5215.19,5218.61) v1@5215.19,5241.54 ; v1@5209.69,5251.04 cw(c5196.41,5251.04) 5205.8,5241.65 cw(c5215.19,5232.26) v1@5215.19,5245.54
  Bottom Layer w4: U21.17@5171.7,5376.32 cw(c5164.87,5369.49) 5174.53,5369.49 cw(c5184.18,5369.49) U21.17@5177.36,5376.32 ; U21.17@5174.53,5402.68 5174.53,5291.7 v1(5215.19,5251.04) ; v1@5205.69,5251.04 ccw(c5182.76,5251.04) 5198.97,5267.26 ccw(c5215.19,5283.48) v1@5215.19,5260.54 ; v1@5209.69,5251.04 ccw(c5196.41,5251.04) 5205.8,5260.43 ccw(c5215.19,5269.82) v1@5215.19,5256.54
VGA.RED3: U8.G9 U21.18 | length 1737.5
  Top Layer w4: v3(5193.15,4465.59) U8.G9@5212.83,4445.91 ; U8.G9@5205.33,4445.91 ccw(c5187.23,4445.91) 5200.03,4458.71 ccw(c5212.83,4471.51) U8.G9@5212.83,4453.41 ; U8.G9@5205.49,4445.91 ccw(c5187.77,4445.91) 5200.3,4458.44 ccw(c5212.83,4470.97) U8.G9@5212.83,4453.25 ; 5205.95,4452.79 ccw(c5193.15,4439.98) 5193.15,4458.09 cw(c5193.15,4439.98) 5205.95,4452.79 ; 5205.95,4452.79 cw(c5218.76,4465.59) 5200.65,4465.59 ccw(c5218.76,4465.59) 5205.95,4452.79
  MidLayer2 w4: v1(5085,5085) 5083.48,5085 5081.86,5083.37 5131.63,5083.37 5135,5080 5255,5080 5270,5065 5270,5030 5265,5025 5174.56,5025 5057.94,4908.37 5048.52,4908.37 5028.19,4888.04 5028.19,4823.12 5062.22,4789.1 5067.27,4784.04 5170.96,4784.04 5177.64,4777.36 5177.64,4720 5177.64,4710 5177.64,4582.64 5177.64,4489.1 ; v1@5088.89,5088.89 ccw(c5102.2,5102.2) 5102.2,5083.37 ; v1@5091.72,5078.28 cw(c5104.01,5065.99) 5104.01,5083.37 ; v1@5091.72,5091.72 ccw(c5111.86,5111.86) 5111.86,5083.37 ; 5177.64,4503.03 5177.64,4489.1 ; 5181.76,4479.17 cw(c5191.69,4489.1) 5177.64,4489.1 ; v3@5185.68,4466.24 ccw(c5167.64,4467.82) 5181.51,4479.46 ccw(c5195.38,4491.1) v3@5193.8,4473.06
  Bottom Layer w4: v1@5078.28,5091.72 ccw(c5062.06,5107.93) 5085,5107.93 ccw(c5107.93,5107.93) v1@5091.72,5091.72 ; v1@5081.11,5088.89 ccw(c5071.72,5098.28) 5085,5098.28 ccw(c5098.28,5098.28) v1@5088.89,5088.89 ; U21.18@5152.01,5376.32 cw(c5145.19,5369.49) 5154.84,5369.49 cw(c5164.5,5369.49) U21.18@5157.67,5376.32 ; U21.18@5154.84,5402.68 5154.84,5326.31 5165.19,5315.96 5165.19,5218.88 5085,5138.69 v1@5085,5086.52 ; v1@5083.48,5085 5081.86,5083.37 v1@5083.48,5085 ; v1@5083.48,5085 v1(5085,5085) v1@5085,5086.52 ; v1@5083.48,5085 5084.24,5085.76 v1@5085,5086.52
VGA.RED4: U8.A8 U21.19 | length 1130.1
  Top Layer w4: v1(5123.52,5064.37) 5117.52,5058.37 5117.52,4927.35 5128.5,4916.37 5164.48,4916.37 5181.86,4899 5181.86,4869.73 5165.96,4853.83 5165.96,4835.73 5173.47,4828.22 5173.47,4724.74 5173.46,4720 5173.46,4710 U8.A8@5173.46,4682.13 ; U8.A8@5168.16,4687.43 ccw(c5155.36,4700.23) 5173.46,4700.23 ccw(c5191.57,4700.23) U8.A8@5178.77,4687.43 ; U8.A8@5168.27,4687.32 ccw(c5155.74,4699.85) 5173.46,4699.85 ccw(c5191.19,4699.85) U8.A8@5178.66,4687.32
  Bottom Layer w4: v1@5114.02,5064.37 cw(c5091.09,5064.37) 5107.31,5048.16 cw(c5123.52,5031.94) v1@5123.52,5054.87 ; v1@5118.02,5064.37 cw(c5104.75,5064.37) 5114.14,5054.99 cw(c5123.52,5045.6) v1@5123.52,5058.87 ; v1(5123.52,5064.37) 5092.52,5033.37 5024.52,5033.37 5006.86,5051.04 5006.86,5071.86 5156.86,5221.86 5156.86,5312.98 5135.16,5334.68 U21.19@5135.16,5402.68 ; U21.19@5132.33,5376.32 cw(c5125.5,5369.49) 5135.16,5369.49 cw(c5144.81,5369.49) U21.19@5137.99,5376.32
VGA.RED5: U8.J9 U21.20 | length 1896.7
  Top Layer w4: v3(5193.15,4386.85) U8.J9@5212.83,4367.17 ; U8.J9@5205.33,4367.17 ccw(c5187.23,4367.17) 5200.03,4379.97 ccw(c5212.83,4392.77) U8.J9@5212.83,4374.67 ; U8.J9@5205.49,4367.17 ccw(c5187.77,4367.17) 5200.3,4379.7 ccw(c5212.83,4392.23) U8.J9@5212.83,4374.51 ; 5205.95,4374.05 ccw(c5193.15,4361.24) 5193.15,4379.35 cw(c5193.15,4361.24) 5205.95,4374.05 ; 5205.95,4374.05 cw(c5218.76,4386.85) 5200.65,4386.85 ccw(c5218.76,4386.85) 5205.95,4374.05
  MidLayer2 w4: v1@4900.14,4898.43 ccw(c4883.92,4914.64) 4906.86,4914.64 ccw(c4929.79,4914.64) v1@4913.57,4898.43 ; v1@4902.97,4895.6 ccw(c4893.58,4904.99) 4906.86,4904.99 ccw(c4920.14,4904.99) v1@4910.75,4895.6 ; v1(4906.86,4891.71) 4906.86,5108.37 4936.52,5138.04 v1(5040.19,5138.04) ; v1@5033.47,5131.32 ccw(c5017.26,5115.11) 5017.26,5138.04 ccw(c5017.26,5160.98) v1@5033.47,5144.76 ; v1@5036.3,5134.15 ccw(c5026.91,5124.76) 5026.91,5138.04 ccw(c5026.91,5151.32) v1@5036.3,5141.93
  Bottom Layer w4: v1@4906.86,4882.21 cw(c4906.87,4859.31) 4923.06,4875.5 ; v1@4906.86,4886.21 cw(c4906.87,4872.95) 4916.24,4882.32 cw(c4925.61,4891.7) v1@4912.36,4891.71 ; v1(4906.86,4891.71) 4923.06,4875.5 ; v1@4916.36,4891.7 ccw(c4939.26,4891.69) 4923.06,4875.5 ; v1(5040.19,5138.04) 5061.73,5138.04 ; v1@5044.25,5134.33 cw(c5052.66,5126.66) 5052.66,5138.04 cw(c5052.66,5149.42) v1@5044.25,5141.75 ; v1@5047.21,5131.64 cw(c5061.73,5118.38) 5061.73,5138.04 ; v1@5047.21,5144.45 ccw(c5061.73,5157.7) 5061.73,5138.04 ; U21.20@5112.64,5376.32 cw(c5105.82,5369.49) 5115.47,5369.49 cw(c5125.13,5369.49) U21.20@5118.3,5376.32 ; U21.20@5115.47,5402.68 5115.47,5343.05 5148.52,5310 5148.52,5224.84 5061.73,5138.04 ; v3@5185.76,4388.15 ccw(c5167.93,4391.3) 5182.76,4401.68 ; v3@5194.45,4394.24 cw(c5197.6,4412.07) 5182.76,4401.68 ; 4923.06,4875.5 5019.98,4875.5 5044.52,4900.04 5124.84,4900.04 5133.5,4908.71 5150.19,4908.71 5167.19,4891.71 5167.19,4844.04 5156.52,4833.37 5156.52,4775 5169.38,4762.14 5169.38,4720 5169.38,4710 5169.38,4700.22 5169.38,4641.96 5169.38,4426.22 ccw(c5193.15,4426.22) 5176.34,4409.41 5182.76,4401.68
VGA.RED6: U8.H9 U21.21 | length 1821.4
  Top Layer w4: v3(5193.15,4426.22) U8.H9@5212.83,4406.54 ; U8.H9@5205.33,4406.54 ccw(c5187.23,4406.54) 5200.03,4419.34 ccw(c5212.83,4432.14) U8.H9@5212.83,4414.04 ; U8.H9@5205.49,4406.54 ccw(c5187.77,4406.54) 5200.3,4419.07 ccw(c5212.83,4431.6) U8.H9@5212.83,4413.88 ; 5205.95,4413.42 ccw(c5193.15,4400.61) 5193.15,4418.72 cw(c5193.15,4400.61) 5205.95,4413.42 ; 5205.95,4413.42 cw(c5218.76,4426.22) 5200.65,4426.22 ccw(c5218.76,4426.22) 5205.95,4413.42
  MidLayer1 w4: 5008.37,5020.53 ccw(c5035,5047.17) v1@5035,5009.5 ; 5015.19,5013.7 ccw(c5035,5033.51) v1@5035,5005.5 ; 5022.02,5006.88 ccw(c5035,5019.85) v1@5035,5001.5 ; 5023.1,5005.8 cw(c5017.3,5000) v1@5025.5,5000 ; v1(5035,5000) 5031.82,5000 v1@5030.36,4998.54 ; v1@5105.69,5300.04 ccw(c5082.76,5300.04) 5098.97,5316.26 ccw(c5115.19,5332.48) v1@5115.19,5309.54 ; v1@5109.69,5300.04 ccw(c5096.41,5300.04) 5105.8,5309.43 ccw(c5115.19,5318.82) v1@5115.19,5305.54 ; v1(5115.19,5300.04) 5056.86,5358.37 4990.19,5358.37 4973.52,5341.71 4973.52,5055.37 v1@5030.36,4998.54 ; v1@5030.36,4998.54 5030.86,4998.04 5029.86,4998.04 v1@5030.36,4998.54
  MidLayer2 w4: v1@5028.28,4993.28 cw(c5012.06,4977.06) 5035,4977.06 cw(c5057.93,4977.06) v1@5041.72,4993.28 ; v1@5031.11,4996.11 cw(c5021.72,4986.72) 5035,4986.72 cw(c5048.28,4986.72) v1@5038.89,4996.11 ; v1(5035,5000) 5035,4910 5020,4895 5020,4820 5063.96,4776.04 5167.65,4776.04 5169.29,4774.4 5169.29,4720 5169.29,4710 5169.29,4640.9 ; 5169.29,4699.16 5169.29,4640.9 ; v3@5185.76,4427.52 ccw(c5167.93,4430.67) 5182.76,4441.05 ; v3@5194.45,4433.61 cw(c5197.6,4451.44) 5182.76,4441.05 ; 5169.29,4640.9 5169.29,4582.64 5169.29,4563.22 5169.29,4489.1 5169.29,4465.85 ccw(c5193.06,4465.85) 5175.68,4449.63 5182.76,4441.05
  Bottom Layer w4: U21.21@5092.96,5376.32 cw(c5086.13,5369.49) 5095.79,5369.49 cw(c5105.44,5369.49) U21.21@5098.62,5376.32 ; U21.21@5095.79,5402.68 5095.79,5362.74 5098.52,5360 5098.52,5325.04 5115.19,5308.37 v1(5115.19,5300.04) ; 5100.85,5322.71 cw(c5079.47,5301.32) v1@5109.69,5300.24 ; 5107.35,5316.21 cw(c5092.01,5300.87) v1@5113.69,5300.09
VGA.RED7: U8.B8 U21.22 | length 1025.3
  Top Layer w4: v1(5098.52,5008.37) 5109.52,4997.37 5109.52,4924.04 5125.19,4908.37 5159.19,4908.37 5173.52,4894.04 5173.52,4872.71 5157.96,4857.14 5157.96,4724.74 5157.96,4720 5157.96,4710 5157.96,4662.47 ccw(c5168.11,4662.47) 5160.93,4655.29 ; U8.B8@5166.12,4642.76 ccw(c5148.4,4642.76) 5160.93,4655.29 ; U8.B8@5173.46,4650.1 cw(c5173.46,4667.83) 5160.93,4655.29
  Bottom Layer w4: U21.22@5073.27,5376.32 cw(c5066.45,5369.49) 5076.1,5369.49 cw(c5085.76,5369.49) U21.22@5078.93,5376.32 ; U21.22@5076.1,5402.68 5076.1,5358.37 5062.52,5344.8 5062.52,5300.08 5065.36,5297.25 5065.36,5210.21 4998.52,5143.37 4998.52,5033.37 5011.9,5020 5060,5020 5062.5,5017.5 5071.63,5008.37 v1(5098.52,5008.37) ; v1@5091.81,5001.66 ccw(c5075.59,4985.44) 5075.59,5008.37 ccw(c5075.59,5031.31) v1@5091.81,5015.09 ; v1@5094.64,5004.49 ccw(c5085.25,4995.1) 5085.25,5008.37 ccw(c5085.25,5021.65) v1@5094.64,5012.26
VGA.VGA_CLK: U8.C5 U21.26 | length 1338.5
  Top Layer w4: v1@4887.19,5493.54 cw(c4887.19,5470.61) 4903.41,5486.82 cw(c4919.63,5503.04) v1@4896.69,5503.04 ; v1@4887.19,5497.54 cw(c4887.19,5484.26) 4896.58,5493.65 cw(c4905.97,5503.04) v1@4892.69,5503.04 ; v1(4887.19,5503.04) 4915.19,5475.04 4920.52,5475.04 4928.86,5466.71 4928.86,5440 4930,5440 4960.25,5409.75 4970,5400 4970,5303.56 4973.86,5299.71 4981.86,5291.71 4981.86,5200.04 4915.19,5133.37 4915.19,4959.71 5012.81,4862.09 ; 5023.52,4851.37 5012.81,4862.09 ; 5012.81,4862.09 5031.49,4843.41 5031.49,4720 5031.49,4710 5031.49,4643.27 ; 5031.49,4643.27 ccw(c5070.17,4643.27) 5042.82,4615.92 ; 5031.49,4643.27 ccw(c5070.17,4643.27) 5042.82,4615.92 ; 5042.82,4615.92 cw(c5030.29,4603.39) 5048.01,4603.39 ccw(c5030.29,4603.39) 5042.82,4615.92 ; 5042.82,4615.92 ccw(c5055.35,4628.45) 5055.35,4610.73 cw(c5055.35,4628.45) 5042.82,4615.92
  Bottom Layer w4: v1@4887.19,5493.54 cw(c4887.19,5470.61) 4903.41,5486.82 cw(c4919.63,5503.04) v1@4896.69,5503.04 ; v1@4887.19,5497.54 cw(c4887.19,5484.26) 4896.58,5493.65 cw(c4905.97,5503.04) v1@4892.69,5503.04 ; v1(4887.19,5503.04) 4907.69,5482.54 4976.55,5482.54 U21.26@4977.68,5481.42 ; 4941.78,5482.54 cw(c4941.78,5469.05) U21.26@4951.32,5478.59 ; 4947.21,5482.54 ccw(c4947.21,5488.36) U21.26@4951.32,5484.25